# Altium PCB Smart Meter V1.0.PcbDoc (part 4 of 4)
Units mil, origin at the board's own origin, x right, y up, seen from the top; angles counter-clockwise.
Board outline 5111 x 3011 mil, 2 copper layers (Top Layer, Bottom Layer); 181 components, 132 nets, 643 pads, 0 vias.
Unrouted connection lines stored in the file: 416.
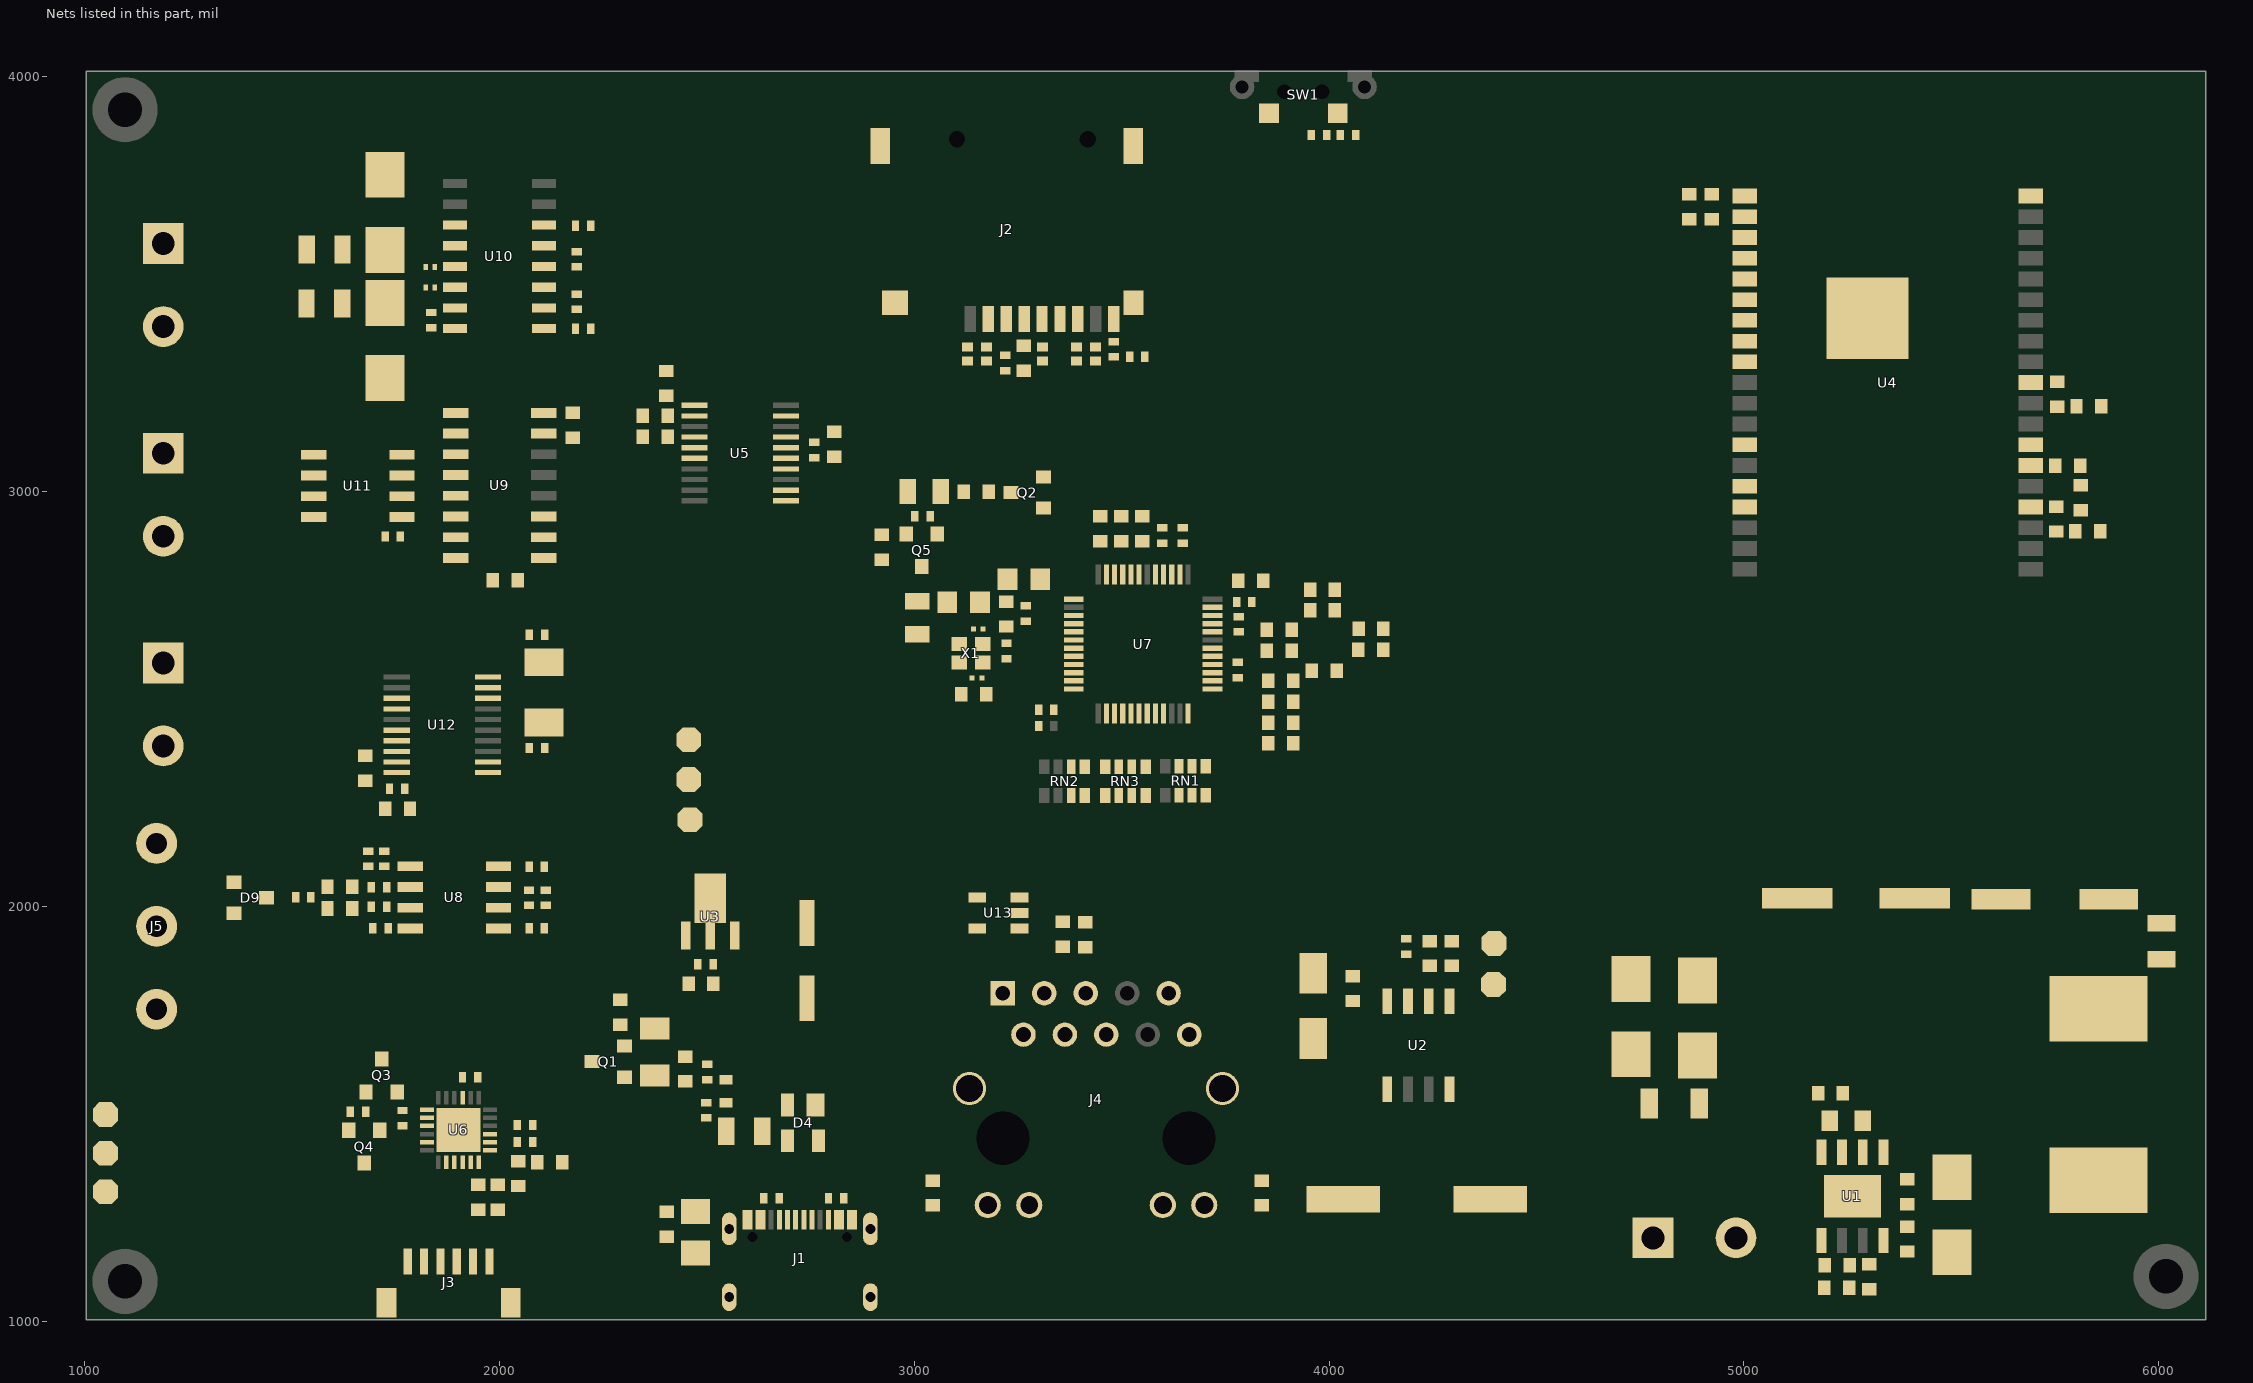
[diagram p2: the nets of this part, all layers, seen from the top]

## Part data (continued)
U13: "TVS DIODE 5.5VWM 8.5VC SOT23-5", Breakdown Voltage=5.5V, Case/Package=SOT-23, Clamping Voltage=7.8V, Clamping Voltage-Max=8V, LCSC Part Number=C10675, Leakage Current=100nA, Manufacturer=Littelfuse, Max Operating Temperature=85°C, Max Power Dissipation=225mW, Min Operating Temperature=-40°C, Power Line Protection=No, Supplier Part Number 1=3283009, Voltage Rating (DC)=5V, Category="TVS Diodes", ComponentLink1Description=https://datasheet.ciiva.com/15143/getdatasheetpartid-152299-15143806.pdf?src-supplier=Verical, ComponentLink1URL=https://datasheet.ciiva.com/15143/getdatasheetpartid-152299-15143806.pdf?src-supplier=Verical, ComponentLink2Description=https://datasheet.ciiva.com/4509/sp05x-leadfree-4509638.pdf?src-supplier=Mouser, ComponentLink2URL=https://datasheet.ciiva.com/4509/sp05x-leadfree-4509638.pdf?src-supplier=Mouser, ComponentLink3Description=https://datasheet.ciiva.com/22697/1911798-22697943.pdf?src-supplier=Element14, ComponentLink3URL=https://datasheet.ciiva.com/22697/1911798-22697943.pdf?src-supplier=Element14, ComponentLink4Description=https://datasheet.ciiva.com/8062/littefuse-spa-sp050x-8062425.pdf?src-supplier=Element14, ComponentLink4URL=https://datasheet.ciiva.com/8062/littefuse-spa-sp050x-8062425.pdf?src-supplier=Element14, ComponentLink5Description=https://datasheet.ciiva.com/332/sp05xxba-332619.pdf?src-supplier=Digi-Key, ComponentLink5URL=https://datasheet.ciiva.com/332/sp05xxba-332619.pdf?src-supplier=Digi-Key, ComponentLink6Description=https://datasheet.ciiva.com/332/sp05xxba-332620.pdf?src-supplier=Digi-Key, ComponentLink6URL=https://datasheet.ciiva.com/332/sp05xxba-332620.pdf?src-supplier=Digi-Key, ComponentLink7Description=https://datasheet.ciiva.com/16393/sp05xxba-16393404.pdf?src-supplier=Future+Electronics, ComponentLink7URL=https://datasheet.ciiva.com/16393/sp05xxba-16393404.pdf?src-supplier=Future+Electronics, ComponentLink8Description=https://datasheet.ciiva.com/332/sp05xxba-332621.pdf?src-supplier=Digi-Key, ComponentLink8URL=https://datasheet.ciiva.com/332/sp05xxba-332621.pdf?src-supplier=Digi-Key, ComponentLink9Description=https://datasheet.ciiva.com/1268/526672-1268494.pdf?src-supplier=Element14, ComponentLink9URL=https://datasheet.ciiva.com/1268/526672-1268494.pdf?src-supplier=Element14, Depth=1.75mm, Diode Type=ZENER, Direction=Unidirectional, ESD Protection=Yes, Height=1.3mm, Item Type="TVS Diode", Lead Free="Lead Free", Length=3.05mm, Manufacturer Part Number=SP0504BAHTG, Max Reverse Leakage Current=100nA, Mounting Technology="Surface Mount", Number of Channels=4, Number of Elements=4, Number of Unidirectional Channels=4, Packaging="Tape and Reel", Peak Pulse Power=225mW, Pins=5, Polarity=Bidirectional,Unidirectional, Power Dissipation=225mW, Pricing 1="1=0.78, 15=0.685, 75=0.625, 300=0.575, 1500=0.52 (USD)", Radiation Hardening=No, Reach SVHC Compliant=Unknown, Reverse Standoff Voltage=5.5V, RoHS=Yes, RoHS Compliant=Yes, Series="SP05, SPA®", Stock 1=1611, Supplier 1="Future Electronics", Termination=SMD/SMT, Width=1.75mm, Working Voltage=5.5V
X1: library part Q22FA12800090, "CRYSTAL 25.0000MHZ 12PF SMD", LCSC Part Number=C255883, Manufacturer="Seiko Epson", Package=SMD2016-4P, ComponentLink1Description=LCSC, ComponentLink1URL=https://www.lcsc.com/product-detail/Crystals_Seiko-Epson-Q22FA12800090_C255883.html, Item Type=Crystal, Manufacturer Part Number=Q22FA12800090
X2: library part X50328MSB2GI, "8MHz 20pF ±10ppm ±50ppm SMD5032-2P Crystals ROHS", LCSC Part Number=C115962, Manufacturer="Yangxing Tech", Package=SMD5032-2P, ComponentLink1Description=LCSC, ComponentLink1URL=https://www.lcsc.com/product-detail/Crystals_Yangxing-Tech-X50328MSB2GI_C115962.html, Item Type=Crystal, Manufacturer Part Number=X50328MSB2GI

## Free pads (board coordinates)
  round 157.48 hole 82.68 mask+1.97: MH(1097,1096) MH(1097,3921) MH(6018,1108)

## Nets (pads, with @x,y where several pads share a name; then routed paths per layer and width w, separated by ;. In a path a pad name is that pad's centre, name@x,y a point inside that pad or via, vN(x,y) a via of type N, cw(c..) or ccw(c..) an arc to the next point about the centre after c; other vN are vias at no path point)
W5500_RST: R41.2 U7.37
+3V3: C9.1 C13.2 C14.2 C15.2 C26.1 C27.1 C30.2 C35.2 C36.2 C39.2 C45.1 C46.1 C47.2 C48.1 C51.2 C52.2 C53.2 J2.4 J3.1 P6.1 Q5.2 R5.2 R10.1 R16.2 R17.1 R18.1 R22.1 R23.2 R27.1 R31.1 R56.2 U3.3 U4.2 U5.1 U5.5 U6.5 U6.6 U6.7 U8.5 U9.16 U10.16 U11.1 U12.20
+5V: C10.2 C11.1 C43.2 C44.2 D3.1 P5.1 Q1.2 R12.2 U3.2 U8.3
+5VP: F2.2 P2.1 Q1.3
+VIN: D8.1 F8.2
CAN_INT: U4.5 U12.13
CAN_N: D9.1 J5.2 R50.2 R52.2
CAN_P: D9.2 J5.1 R48.1 R49.2
CAN_RX: R51.2 TP1.1 U12.2
CAN_TX: R47.2 TP2.1 U12.1
DTR: Q4.2 R29.2 U6.23
ESP_CAN_CS: R22.2 SB3.2 U12.18
ESP_EN: C22.2 J3.6 Q3.3 R23.1 SW1.2 U4.3
ESP_RX: U4.6 U9.15
ESP_TX: R5.1 SB1.2 U9.4
GND: C2.1 C5.2 C6.2 C7.1 C8.1 C9.2 C10.1 C11.2 C12.2 C13.1 C14.1 C16.1 C17.1 C18.1 C19.1 C20.1 C21.1 C22.1 C23.2 C24.2 C25.1 C26.2 C27.2 C28.1 C29.1 C30.1 C33.1 C34.2 C35.1 C36.1 C37.2 C39.1 C40.1 C41.1 C43.1 C44.1 C45.2 C46.2 C47.1 C48.2 C49.1 C50.1 C51.1 C52.1 C53.1 C54.1 C55.1 C56.1 C57.1 D2.1 D4.1 D9.3 D10.1 D11.1 D13.2 D14.2 D15.2 D16.2 D17.2 J1.A1/B12 J1.B1/A12 J2.6 J2.10 J2.11 J2.12 J2.13 J3.2 J3.MP1 J3.MP2 J4.GND1 J4.GND2 J5.3 J9.2 Q2.2 R9.1 R11.1 R12.1 R13.1 R14.1 R15.2 R19.1 R20.1 R21.1 R26.1 R28.1 R55.1 R57.1 RN2.3 RN2.4 RN3.1 RN3.2 RN3.3 RN3.4 SW1.1 U1.4 U2.5 U3.1 U4.1 U4.15 U4.38 U4.39 U5.6 U5.7 U5.9 U5.15 U6.2 U6.25 U7.3 U7.9 U7.14 U7.16 U7.19 U7.29 U7.48 U8.2 U9.7 U9.8 U10.15 U11.4 U12.10 U13.2 X1.2 X1.4
IO0: J3.5 Q4.3 SB2.1 U4.25
MISO_3.3V: D16.1 J2.7 U4.8 U12.17
MOSI_3.3V: D14.1 J2.3 U4.16 U12.16
NetC1_1: C1.1 D2.2 L1.1 U1.1
NetC1_2: C1.2 R1.1
NetC2_2: C2.2 C23.1 D7.2 D8.2 R4.2 U1.3
NetC4_1: C4.1 R6.1 R9.2 U1.5
NetC4_2: C4.2 C5.1 F2.1 L1.2 R6.2
NetC7_2: C7.2 F1.2 FB1.1
NetC12_1: C12.1 J1.S1 J1.S2 J1.S3 J1.S4 R15.1
NetC15_1: C15.1 Q5.1 R3.1 R10.2
NetC16_2: C16.2 FB2.1 Q5.3 R31.2
NetC24_1: C24.1 R25.2 R26.2 U6.8
NetC31_2: C31.2 R32.1 R36.2
NetC32_2: C32.2 R33.1 R35.2
NetC33_2: C33.2 J4.3 R35.1 R36.1
NetC34_1: C34.1 J4.4 R42.1
NetC37_1: C37.1 R48.2 R50.1
NetC38_1: C38.1 U10.1
NetC38_2: C38.2 U10.3
NetC40_2: C40.2 U10.2
NetC41_2: C41.2 U10.6
NetC42_1: C42.1 U10.4
NetC42_2: C42.2 U10.5
NetC49_2: C49.2 U12.9 X2.2
NetC50_2: C50.2 U12.8 X2.1
NetC54_2: C54.2 U7.22
NetC55_2: C55.2 U7.20
NetC56_2: C56.2 R44.1 U7.30 X1.1
NetC57_2: C57.2 R45.1 X1.3
NetD4_2: D4.2 F1.1 J1.A4/B9 J1.B4/A9
NetD10_2: D10.2 F7.2 R54.1
NetD11_2: D11.2 F6.2 R53.1
NetF8_1: F8.1 J9.1
NetJ1_A5: J1.A5 R14.2
NetJ1_B5: J1.B5 R13.2
NetJ4_12: J4.12 R43.1
NetJ4_14: J4.14 R46.1
NetQ2_3: Q2.3 R3.2
NetQ3_1: Q3.1 R29.1
NetQ4_1: Q4.1 R30.1
NetR1_2: R1.2 U1.8
NetR2_1: R2.1 U2.3
NetR4_1: R4.1 U1.2 U1.9
NetR7_2: R7.2 U2.1
NetR8_2: R8.2 U2.2
NetR16_1: R16.1 U12.19
NetR27_2: R27.2 U6.9
NetR28_2: R28.2 U6.15
NetR32_2: R32.2 U7.5
NetR33_2: R33.2 U7.6
NetR34_2: R34.2 U7.1
NetR37_2: R37.2 U7.2
NetR43_2: R43.2 U7.25
NetR44_2: R44.2 R45.2 U7.31
NetR46_2: R46.2 U7.27
NetR47_1: R47.1 U8.1
NetR49_1: R49.1 U8.7
NetR51_1: R51.1 U8.4
NetR52_1: R52.1 U8.6
NetR53_2: R53.2 U10.13
NetR54_2: R54.2 U10.14
NetR55_2: R55.2 U7.10
NetR57_2: R57.2 U8.8
NetRN1_1: RN1.1 U7.45
NetRN1_2: RN1.2 U7.44
NetRN1_3: RN1.3 U7.43
NetRN2_5: RN2.5 U7.39
NetRN2_6: RN2.6 U7.38
NetRN3_5: RN3.5 U7.23
NetRN3_6: RN3.6 U7.42
NetRN3_7: RN3.7 U7.41
NetRN3_8: RN3.8 U7.40
NetSB1_1: SB1.1 U4.29
NetSB3_1: SB3.1 U4.23
POE_PWR_N: C3.1 D1.2 J4.10 P3.1 R7.1 R8.1 U2.4
POE_PWR_P: C3.2 C6.1 D1.1 D7.1 J4.9 P1.1 R2.2 U2.8
R_RXCLK: R17.2 SB2.2
RD_N: C31.1 J4.2 U13.1
RD_P: C32.1 J4.1 U13.5
RS232_RX: F6.1 J6.1
RS232_TX: F7.1 J6.2
RS422_N: J8.2 U11.6
RS422_P: J8.1 U11.5
RS485_N: J7.2 U11.7
RS485_P: J7.1 U11.8
RTS: Q3.2 R30.2 U6.19
RXD: J3.4 U6.21
RXD_RS232: U9.3 U10.12
RXD_RS485/422: U9.5 U11.2
S0: R19.2 U5.12 U9.11
S1: R20.2 U5.14 U9.10
S2: R21.2 U5.16 U9.9
SCK_3.3V: D15.1 J2.5 U4.13 U12.14
SCL: U4.7 U5.2
SD_CS_3.3V: D13.1 J2.2 U4.9
SD_DET: D17.1 J2.9 R24.1
SDA: U4.26 U5.4
SDMMC_DET: R24.2 R56.1 U4.4
SW_EN: R18.2 U5.11 U9.6
TD_N: J4.6 R34.1 R40.1 U13.4
TD_P: J4.5 R37.1 R38.1 U13.3
TXD: J3.3 U6.20
TXD_RS232: U9.1 U10.11
TXD_RS485/422: U9.2 U11.3
USB_D_N: D4.4 J1.A7 J1.B7 U6.4
USB_D_P: D4.3 J1.A6 J1.B6 U6.3
VBUS: C8.2 D3.2 FB1.2 P4.1 Q1.1 R11.2 R25.1
VDD: C17.2 C18.2 FB2.2 FB3.1 J4.11 J4.13 R39.1 R41.1 RN1.6 RN1.7 RN1.8 U7.28
VDDA: C19.2 C20.2 C21.2 C25.2 C28.2 C29.2 FB3.2 R38.2 R40.2 R42.2 U7.4 U7.8 U7.11 U7.15 U7.17 U7.21
W5500_CS: U7.32
W5500_INT: R39.2 U7.36
W5500_MISO: U7.34
W5500_MOSI: U7.35
W5500_PWR_EN: Q2.1
W5500_SCLK: U7.33
pads on no net: J1.A8 J1.B8 J1.MH J2.1 J2.8 J2.MH J4.7 J4.8 J4.MH RN1.4 RN1.5 RN2.1 RN2.2 RN2.7 RN2.8 SW1.3 SW1.4 SW1.5 SW1.6 SW1.MH0 SW1.MH1 U1.6 U1.7 U2.6 U2.7 U4.10 U4.11 U4.12 U4.14 U4.17 U4.18 U4.19 U4.20 U4.21 U4.22 U4.24 U4.27 U4.28 U4.30 U4.31 U4.32 U4.33 U4.34 U4.35 U4.36 U4.37 U5.3 U5.8 U5.10 U5.13 U5.17 U5.18 U5.19 U5.20 U6.1 U6.10 U6.11 U6.12 U6.13 U6.14 U6.16 U6.17 U6.18 U6.22 U6.24 U7.7 U7.12 U7.13 U7.18 U7.24 U7.26 U7.46 U7.47 U9.12 U9.13 U9.14 U10.7 U10.8 U10.9 U10.10 U12.3 U12.4 U12.5 U12.6 U12.7 U12.11 U12.12 U12.15

## Silkscreen, mask and mechanical layers (free items; w line width, h text height)
Top Overlay:
  text "INPUT" at 4681,1405.31 h70
Dimension:
  the board outline again, w10

## Text inside footprints (layer, text, board x,y; h text height)
J1: Top Overlay "PCB Edge" at 2677.04,1040.18 h20